# Altium PCB DA13_FPGA_edition.PcbDoc (part 2 of 3)
Units mm, origin at the board's own origin, x right, y up, seen from the top; angles counter-clockwise.
Board outline 118.01 x 92.01 mm, 2 copper layers (Top Layer, Bottom Layer); 473 components, 250 nets, 1417 pads, 16 vias.
Unrouted connection lines stored in the file: 993.
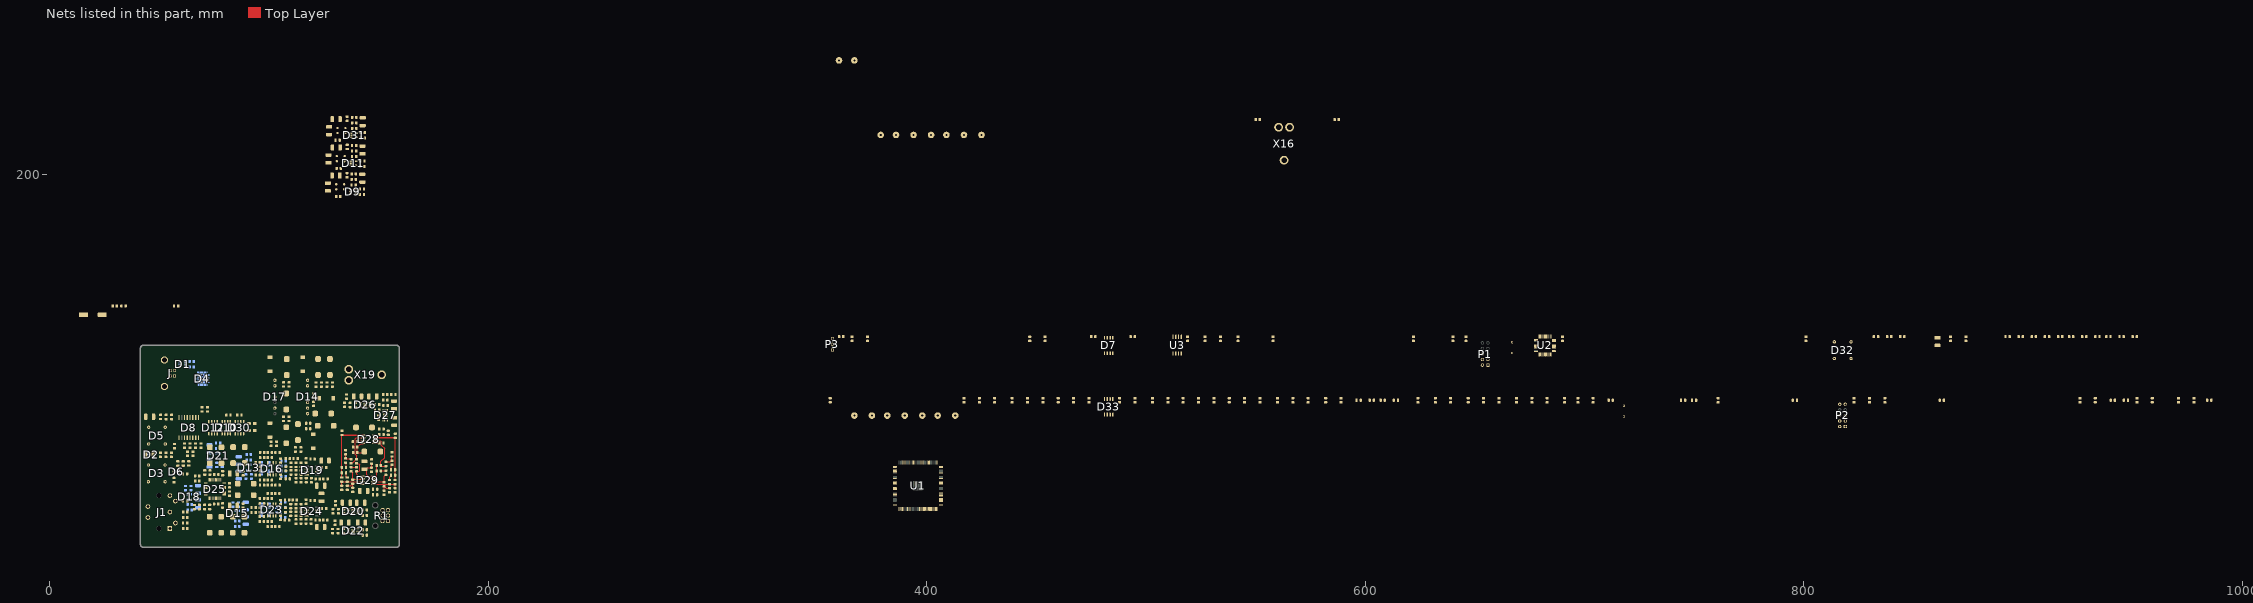
[diagram p2: the nets of this part, all layers, seen from the top]

## Part data
C1 C3 C7 C8 C11 C15 C16 C17 C18 C19 C20 C21 C22 C23 C24 C25 C26 C27 C28 C29 C32 C35 C37 C39 C42 C44 C46 C47 C48 C49 C50 C54 C55 C56 C58 C59 C60 C63 C64 C66 C67 C68 C70 C71 C72 C74 C75 C76 C77 C78 C79 C80 C81 C85 C87 C88 C89 C90 C91 C92 C93 C94 C95 C98 C99 C101 C102 C106 C107 C108 C109 C110 C113 C114 C115 C120 C121 C122 C123 C124 C125 C126 C127 C128 C129 C130 C131 C132 C133 C134 C137 C139 C143 C144 C146 C149 C154 C155 C156 C159 C160 C161 C162 C165 C166 C167 C168 C169 C170 C171 C174 C175 C176 C179 C180 C181 C182 C183 C185 C186 C187 C188 C191 C193 C195 C198 C199 C202 C203 C204 C205 C206 C207 C208 C209 C210 C211 C212 C213 C214 C215 C216 C217 C218 C219 C220 C221 C222 C223 C224 C225 C226 C227 C228 C229 C230 C231 C232 C233 C234 C235 C236 C237: "Ceramic capacitor 0805 X7R 0.1µF 50V", Capacitance=100nF, Case Code (Imperial)=0805, Case Code (Metric)=2012, Dielectric=X7R, Manufacturer 1=Yageo, Max Operating Temperature=125°C, Min Operating Temperature=-55°C, Supplier Part Number 1=311-4351-1-ND, Tolerance=20%, Voltage=50V, Case/Package=0805, Category="Ceramic Capacitors", ComponentLink1Description=https://datasheet.ciiva.com/13207/upy-gphc-x7r-6-3v-to-50v-8-12304-13207535.pdf?src-supplier=Mouser, ComponentLink1URL=https://datasheet.ciiva.com/13207/upy-gphc-x7r-6-3v-to-50v-8-12304-13207535.pdf?src-supplier=Mouser, Depth=1.25mm, Halogen Free="Halogen Free", Lead Free="Lead Free", Length=0.079inch, Manufacturer Part Number 1=CC0805MRX7R9BB104, Mount=SMT, Packaging="Tape and Reel", Pricing 1="1=0,15000, 10=0,10700, 50=0,06080, 100=0,05040, 500=0,03536, 1000=0,02927 (USD)", RoHS=Yes, RoHS Compliant=Yes, Series=CC, Stock 1=29978, Supplier 1=Digi-Key, Thickness=0.037inch, Type=Конденсатор, Voltage Rating=50V, Voltage Rating (DC)=50V, Width=0.049inch
C2 C5 C9 C31 C34 C36 C38 C41 C43 C52 C53 C61 C62 C82 C83 C96 C97 C100 C103 C104 C105 C111 C112 C116 C117 C118 C119 C136 C140 C157 C158 C163 C164 C177 C178 C184 C189 C190 C194 C196: library part TANT_B, "Описание свойств компонента"
C4: "Aluminium capacitor 10x10.2 1000 µF 10 V", Capacitance=1mF, Case Code (Metric)=10x10.2, Case/Package="10x10,2 (SMD-2)", Dielectric Material=Aluminium, ESR (Equivalent Series Resistance)=80mR, Leakage Current=100uA, Manufacturer 2=Panasonic, Manufacturer Part Number 2=EEE-FK1A102AP, Max Operating Temperature=105°C, Min Operating Temperature=-55°C, Package Quantity=500, Ripple Current=850mA, Supplier Part Number 1=EEE-FK1E471GP, Tolerance=20%, Voltage=10V, Category="Aluminum Electrolytic Capacitors", ComponentLink1Description=https://datasheet.ciiva.com/11783/0900766b80bed286-11783449.pdf?src-supplier=RSComponents, ComponentLink1URL=https://datasheet.ciiva.com/11783/0900766b80bed286-11783449.pdf?src-supplier=RSComponents, ComponentLink2Description=https://datasheet.ciiva.com/43454/58258-43454698.pdf?src-supplier=Farnell, ComponentLink2URL=https://datasheet.ciiva.com/43454/58258-43454698.pdf?src-supplier=Farnell, ComponentLink3Description=https://datasheet.ciiva.com/46388/58258-46388200.pdf?src-supplier=Element14, ComponentLink3URL=https://datasheet.ciiva.com/46388/58258-46388200.pdf?src-supplier=Element14, ComponentLink4Description=https://datasheet.ciiva.com/24024/aba0000ce120-24024165.pdf?src-supplier=Mouser, ComponentLink4URL=https://datasheet.ciiva.com/24024/aba0000ce120-24024165.pdf?src-supplier=Mouser, ComponentLink5Description=https://datasheet.ciiva.com/14602/70068081-14602683.pdf?src-supplier=Allied+Electronics, ComponentLink5URL=https://datasheet.ciiva.com/14602/70068081-14602683.pdf?src-supplier=Allied+Electronics, ComponentLink6Description=https://datasheet.ciiva.com/14607/70068081-14607445.pdf?src-supplier=Allied+Electronics, ComponentLink6URL=https://datasheet.ciiva.com/14607/70068081-14607445.pdf?src-supplier=Allied+Electronics, ComponentLink7Description=https://datasheet.ciiva.com/2985/aba0000ce119-2985368.pdf?src-supplier=Avnet, ComponentLink7URL=https://datasheet.ciiva.com/2985/aba0000ce119-2985368.pdf?src-supplier=Avnet, ComponentLink8Description=https://datasheet.ciiva.com/2985/aba0000ce119-2985367.pdf?src-supplier=Avnet, ComponentLink8URL=https://datasheet.ciiva.com/2985/aba0000ce119-2985367.pdf?src-supplier=Avnet, Construction=Cylindrical, Contact Plating=Tin, Diameter=10mm, Dissipation Factor=0.19%, Height=10.2mm, Height - Seated (Max)=0.402inch, Impedance=80mR, Lead Free="Lead Free", Lead Length=3.5mm, Lead Pitch=4.6mm, Length=10.2mm, Life (Hours)=2000Hour, Mount=SMT, Number of Pins=2, Packaging="Tape and Reel", Pricing 2="1=0,75620, 500=0,34460 (USD)", Radiation Hardening=No, REACH SVHC=Unknown, Ripple Current (AC)=850mA, RoHS=Yes, RoHS Compliant=Yes, Series=FK, Stock 2=4, Supplier 1=Avnet, Supplier 2="Arrow Electronics", Termination=SMD/SMT, Type="Конденсатор электролитический", Voltage Rating=10V, Voltage Rating (DC)=10V, Width=10.3mm
C6 C10 C14 C197: "Ceramic capacitor 0805 C0G 16pF 50V", Capacitance=22pF, Case Code (Imperial)=0805, Case Code (Metric)=2012, Dielectric=C0G, Dielectric Material=Ceramic, Manufacturer 1=Yageo, Manufacturer Part Number 1=CC0805JRNPO9BN220, Max Operating Temperature=125°C, Min Operating Temperature=-55°C, Package Quantity=1, Supplier Part Number 1=311-1103-1-ND, Tolerance=5%, Voltage=50V, Case/Package=0805, Category="Ceramic Capacitors", ComponentLink1Description=https://datasheet.ciiva.com/144/mlccorderingcode-144745.pdf?src-supplier=Digi-Key, ComponentLink1URL=https://datasheet.ciiva.com/144/mlccorderingcode-144745.pdf?src-supplier=Digi-Key, ComponentLink2Description=https://datasheet.ciiva.com/8033/1734582-8033931.pdf?src-supplier=Element14, ComponentLink2URL=https://datasheet.ciiva.com/8033/1734582-8033931.pdf?src-supplier=Element14, ComponentLink3Description=https://datasheet.ciiva.com/8033/1734582-8033933.pdf?src-supplier=Element14, ComponentLink3URL=https://datasheet.ciiva.com/8033/1734582-8033933.pdf?src-supplier=Element14, ComponentLink4Description=https://datasheet.ciiva.com/144/mlccorderingcode-144746.pdf?src-supplier=Digi-Key, ComponentLink4URL=https://datasheet.ciiva.com/144/mlccorderingcode-144746.pdf?src-supplier=Digi-Key, ComponentLink5Description=https://datasheet.ciiva.com/144/mlccorderingcode-144747.pdf?src-supplier=Digi-Key, ComponentLink5URL=https://datasheet.ciiva.com/144/mlccorderingcode-144747.pdf?src-supplier=Digi-Key, ComponentLink6Description=https://datasheet.ciiva.com/13264/upy-gp-np0-16v-to-50v-8-3714-13264491.pdf?src-supplier=Mouser, ComponentLink6URL=https://datasheet.ciiva.com/13264/upy-gp-np0-16v-to-50v-8-3714-13264491.pdf?src-supplier=Mouser, Construction=Flat, Depth=1.25mm, Height=0.6mm, Lead Free="Lead Free", Length=2mm, Manufacturer 2=Yageo, Manufacturer Part Number 2=CC0805JRNPO9BN160, Mount=SMT, Number of Pins=2, Packaging="Tape and Reel", Pricing 1="1=0,11000, 10=0,07800, 50=0,04280, 100=0,03490, 500=0,02492, 1000=0,01958 (USD)", Pricing 2="1=0,15000, 10=0,10700, 50=0,06080, 100=0,05040, 500=0,03536, 1000=0,02927 (USD)", Radiation Hardening=No, REACH SVHC="No SVHC", Resistor Type=Ceramic, RoHS=Yes, RoHS Compliant=Yes, Series=CC, Stock 1=117464, Stock 2=956, Supplier 1=Digi-Key, Supplier 2=Digi-Key, Supplier Part Number 2=311-4228-1-ND, Termination=SMD/SMT, Thickness=0.024inch, Type=Конденсатор, Voltage Rating=50V, Voltage Rating (DC)=50V, Weight=0.000194oz, Width=1.25mm
C12 C13 C200 C201: "Ceramic capacitor 0805 NPO 22pF 16V", Capacitance=22pF, Case Code (Imperial)=0805, Case Code (Metric)=2012, Dielectric=C0G, Dielectric Material=Ceramic, Manufacturer 1=Yageo, Manufacturer Part Number 1=CC0805JRNPO9BN220, Max Operating Temperature=125°C, Min Operating Temperature=-55°C, Package Quantity=1, Supplier Part Number 1=311-1103-1-ND, Tolerance=5%, Voltage=50V, Case/Package=0805, Category="Ceramic Capacitors", ComponentLink1Description=https://datasheet.ciiva.com/144/mlccorderingcode-144745.pdf?src-supplier=Digi-Key, ComponentLink1URL=https://datasheet.ciiva.com/144/mlccorderingcode-144745.pdf?src-supplier=Digi-Key, ComponentLink2Description=https://datasheet.ciiva.com/8033/1734582-8033931.pdf?src-supplier=Element14, ComponentLink2URL=https://datasheet.ciiva.com/8033/1734582-8033931.pdf?src-supplier=Element14, ComponentLink3Description=https://datasheet.ciiva.com/8033/1734582-8033933.pdf?src-supplier=Element14, ComponentLink3URL=https://datasheet.ciiva.com/8033/1734582-8033933.pdf?src-supplier=Element14, ComponentLink4Description=https://datasheet.ciiva.com/144/mlccorderingcode-144746.pdf?src-supplier=Digi-Key, ComponentLink4URL=https://datasheet.ciiva.com/144/mlccorderingcode-144746.pdf?src-supplier=Digi-Key, ComponentLink5Description=https://datasheet.ciiva.com/144/mlccorderingcode-144747.pdf?src-supplier=Digi-Key, ComponentLink5URL=https://datasheet.ciiva.com/144/mlccorderingcode-144747.pdf?src-supplier=Digi-Key, Construction=Flat, Depth=1.25mm, Height=0.6mm, Lead Free="Lead Free", Length=2mm, Mount=SMT, Number of Pins=2, Packaging="Tape and Reel", Pricing 1="1=0,11000, 10=0,07800, 50=0,04280, 100=0,03490, 500=0,02492, 1000=0,01958 (USD)", Radiation Hardening=No, REACH SVHC="No SVHC", Resistor Type=Ceramic, RoHS=Yes, RoHS Compliant=Yes, Series=CC, Stock 1=117464, Supplier 1=Digi-Key, Termination=SMD/SMT, Thickness=0.024inch, Type=Конденсатор, Voltage Rating=50V, Voltage Rating (DC)=50V, Width=1.25mm
C30: "Ceramic capacitor 1206 X7R 22µF 10V", Capacitance=22uF, Case Code (Imperial)=1206, Case Code (Metric)=3216, Dielectric=X7R, Manufacturer 1=Murata, Max Operating Temperature=125°C, Min Operating Temperature=-55°C, Package Quantity=1, Tolerance=10%, Voltage=10V, Case/Package=1206, Category="Ceramic Capacitors", ComponentLink1Description=https://datasheet.ciiva.com/6072/1747483-6072695.pdf?src-supplier=Farnell, ComponentLink1URL=https://datasheet.ciiva.com/6072/1747483-6072695.pdf?src-supplier=Farnell, ComponentLink2Description=https://datasheet.ciiva.com/11787/0900766b80ef921d-11787760.pdf?src-supplier=RSComponents, ComponentLink2URL=https://datasheet.ciiva.com/11787/0900766b80ef921d-11787760.pdf?src-supplier=RSComponents, ComponentLink3Description=https://datasheet.ciiva.com/3777/1492grm31cr71a226ke1523-3777120.pdf?src-supplier=Arrow+Electronics, ComponentLink3URL=https://datasheet.ciiva.com/3777/1492grm31cr71a226ke1523-3777120.pdf?src-supplier=Arrow+Electronics, ComponentLink4Description=https://datasheet.ciiva.com/29202/451120-da-01-de-vs-chip-kond-1206-22-0-uf-10pr-10-0v-x7r-29202604.pdf?src-supplier=Conrad, ComponentLink4URL=https://datasheet.ciiva.com/29202/451120-da-01-de-vs-chip-kond-1206-22-0-uf-10pr-10-0v-x7r-29202604.pdf?src-supplier=Conrad, ComponentLink5Description=https://datasheet.ciiva.com/29202/451412-da-01-de-vs-kondens-grm31-cr71a-226ke15l-29202268.pdf?src-supplier=Conrad, ComponentLink5URL=https://datasheet.ciiva.com/29202/451412-da-01-de-vs-kondens-grm31-cr71a-226ke15l-29202268.pdf?src-supplier=Conrad, ComponentLink6Description=https://datasheet.ciiva.com/14116/grmseries-highdielectrictype-eng-14116398.pdf?src-supplier=Distrelec, ComponentLink6URL=https://datasheet.ciiva.com/14116/grmseries-highdielectrictype-eng-14116398.pdf?src-supplier=Distrelec, ComponentLink7Description=https://datasheet.ciiva.com/7937/1747483-7937735.pdf?src-supplier=Element14, ComponentLink7URL=https://datasheet.ciiva.com/7937/1747483-7937735.pdf?src-supplier=Element14, ComponentLink8Description=https://datasheet.ciiva.com/142/partnumbering-e-01-142120.pdf?src-supplier=Digi-Key, ComponentLink8URL=https://datasheet.ciiva.com/142/partnumbering-e-01-142120.pdf?src-supplier=Digi-Key, ComponentLink9Description=https://datasheet.ciiva.com/142/partnumbering-e-01-142119.pdf?src-supplier=Digi-Key, ComponentLink9URL=https://datasheet.ciiva.com/142/partnumbering-e-01-142119.pdf?src-supplier=Digi-Key, ComponentLink10Description=https://datasheet.ciiva.com/142/partnumbering-e-01-142121.pdf?src-supplier=Digi-Key, ComponentLink10URL=https://datasheet.ciiva.com/142/partnumbering-e-01-142121.pdf?src-supplier=Digi-Key, ComponentLink11Description=https://datasheet.ciiva.com/48671/product-48671339.pdf?src-supplier=Avnet, ComponentLink11URL=https://datasheet.ciiva.com/48671/product-48671339.pdf?src-supplier=Avnet, ComponentLink12Description=https://datasheet.ciiva.com/16440/product-16440671.pdf?src-supplier=Future+Electronics, ComponentLink12URL=https://datasheet.ciiva.com/16440/product-16440671.pdf?src-supplier=Future+Electronics, ComponentLink13Description=https://datasheet.ciiva.com/2989/product-2989773.pdf?src-supplier=Avnet, ComponentLink13URL=https://datasheet.ciiva.com/2989/product-2989773.pdf?src-supplier=Avnet, Construction=Flat, Depth=1.6mm, Height=1.6mm, Lead Free="Lead Free", Length=3.2mm, Manufacturer Part Number 1=GRM31CR71A226KE15L, Material=Ceramic, Mount=SMT, Packaging="Tape and Reel", Pricing 1="1=0,81930, 10=0,51230, 25=0,48340, 100=0,42480, 250=0,42420, 500=0,35180, 1000=0,34810, 3000=0,30810, 6000=0,24770, 15000=0,23430 (USD)", Radiation Hardening=No, REACH SVHC="No SVHC", RoHS=Yes, RoHS Compliant=Yes, Series=GRM, Stock 1=16303, Supplier 1="Arrow Electronics", Supplier Part Number 1=GRM31CR71A226KE15L, Termination=SMD/SMT, Thickness=0.071inch, Type=Конденсатор, Voltage Rating=10V, Voltage Rating (DC)=10V, Width=0.063inch
C33 C40 C192: "Ceramic capacitor 0805 X7R 100pF 50V", Capacitance=1nF, Case Code (Imperial)=0805, Case Code (Metric)=2012, Dielectric=X7R, Manufacturer 2=Yageo, Manufacturer Part Number 2=CC0805MRX7R9BB102, Max Operating Temperature=125°C, Min Operating Temperature=-55°C, Resistor Type=Ceramic, Supplier Part Number 1=311-4349-1-ND, Tolerance=20%, Voltage=50V, Case/Package=0805, Category="Ceramic Capacitors", ComponentLink1Description=http://www.mouser.com/ds/2/447/Yageo_UPY-GP_NP0_16V-to-50V_9-358835.pdf?src-supplier=Mouser, ComponentLink1URL=http://www.mouser.com/ds/2/447/Yageo_UPY-GP_NP0_16V-to-50V_9-358835.pdf?src-supplier=Mouser, ComponentLink2Description=http://components.arrow.com/part/dataview/0323_04166629?src-supplier=Arrow+Europe, ComponentLink2URL=http://components.arrow.com/part/dataview/0323_04166629?src-supplier=Arrow+Europe, ComponentLink3Description=http://www.yageo.com/documents/recent/UPY-GPHC_X7R_6.3V-to-50V_18.pdf?src-supplier=Digi-Key, ComponentLink3URL=http://www.yageo.com/documents/recent/UPY-GPHC_X7R_6.3V-to-50V_18.pdf?src-supplier=Digi-Key, Depth=1.25mm, Halogen Free="Halogen Free", Lead Free="Lead Free", Length=0.079inch, Mount=SMT, Packaging="Tape and Reel", Pricing 2="1=0,14000, 10=0,08800, 50=0,08800, 100=0,03900, 1000=0,02500, 10000=0,02100 (USD)", RoHS=Yes, RoHS Compliant=Yes, Series=CC, Stock 2=5617, Supplier 1=Digi-Key, Supplier 2=Mouser, Supplier Part Number 2=603-CC805MRX7R9BB102, Thickness=0.028inch, Type=Конденсатор, Voltage Rating=50V, Voltage Rating (DC)=50V, Width=0.049inch
C45 C51 C57 C65 C69 C73 C84 C86 C135 C138 C141 C142 C147 C148 C150 C151 C152 C153 C172 C173: library part TANT_D, "Описание свойств компонента"
C145: "Ceramic capacitor 0805 X7R 1uF 50V", Capacitance=1uF, Case Code (Imperial)=0805, Case Code (Metric)=2012, Dielectric=X7R, Manufacturer 2=Yageo, Max Operating Temperature=125°C, Min Operating Temperature=-55°C, Resistor Type=Ceramic, Supplier Part Number 1=311-4349-1-ND, Tolerance=10%, Voltage=50V, Case/Package=0805, Category="Ceramic Capacitors", ComponentLink1Description=https://datasheet.ciiva.com/13209/upy-gphc-x7r-6-3v-to-50v-8-12304-13209375.pdf?src-supplier=Mouser, ComponentLink1URL=https://datasheet.ciiva.com/13209/upy-gphc-x7r-6-3v-to-50v-8-12304-13209375.pdf?src-supplier=Mouser, Construction=Flat, Depth=1.25mm, Halogen Free="Halogen Free", Height=1.25mm, Lead Free="Lead Free", Length=2mm, Manufacturer Part Number 2=CC0805KKX7R9BB105, Mount=SMT, Packaging="Tape and Reel", Pricing 2="1=0,26000, 10=0,17900, 50=0,11920, 100=0,10130, 500=0,07152, 1000=0,06257 (USD)", Radiation Hardening=No, RoHS=Yes, RoHS Compliant=Yes, Series=CC, Stock 2=48794, Supplier 1=Digi-Key, Supplier 2=Digi-Key, Supplier Part Number 2=311-1886-1-ND, Termination=SMD/SMT, Thickness=0.057inch, Type=Конденсатор, Voltage Rating=50V, Voltage Rating (DC)=50V, Weight=0.000194oz, Width=0.049inch
D1: "Very low capacitance ESD protection", Case/Package=SOT-23-6, Supplier Part Number 1=7131158, Mount=SMT, Supplier 1="Future Electronics", Type=Микросхема
D2: "Single Schmitt-Trigger Inverter", Case/Package=SOT-23-5, Supplier Part Number 1=296-11607-1-ND, Mount=SMT, Supplier 1=Digi-Key, Type=Микросхема
D3 D5 D32: library part OSC_4PIN_DIL, "Описание свойств компонента"
D4: library part CT7601, "Описание свойств компонента"
D6: library part 1G32, "Описание свойств компонента"
D7 D33: "3V 32M-BIT SERIAL FLASH MEMORY WITH DUAL, QUAD SPI", Case/Package=SOIC-8-208, Supplier Part Number 1=W25Q32JVSSIQCT-ND, Mount=SMT, Supplier 1=Digi-Key, Supplier 2=Digi-Key, Supplier 3=RSComponents, Supplier 4="Arrow Electronics", Supplier 5=RSComponents, Supplier Part Number 2=W25Q32JVSSIQ-ND, Supplier Part Number 3=1882528, Supplier Part Number 4="W25Q32JVSSIM TR", Supplier Part Number 5=1712228, Type=Микросхема
D8: library part ADUM140X, "Описание свойств компонента"
D9 D11 D31: library part SY8088, "Описание свойств компонента"
D10 D12 D30: library part ADUM1250, "Описание свойств компонента"
D13 D15 D18 D21: library part LP2985, "Описание свойств компонента"
D14: library part AM3D-0509DH30Z, "Описание свойств компонента"
D16 D23: library part OPA1632_SOIC, "Описание свойств компонента"
D17: library part AM3D-0509SZ, "Описание свойств компонента"
D19 D24: library part TL061, "Описание свойств компонента"
D20 D22 D26 D27: library part TPS7A4901/3001, "Описание свойств компонента"
D25: library part AK4490_TQFP, "Описание свойств компонента"
D28 D29: "Dual standard, industrial-grade, operational amplifier 8-SOIC -25 to 85", Case/Package=SOIC-8-150, Dual Supply Voltage=9V, Input Bias Current=200pA, Input Offset Voltage (Vos)=3mV, Manufacturer 1="Texas Instruments", Manufacturer Part Number 2=TL062ID, Max Dual Supply Voltage=18V, Max I/O Voltage=6mV, Max Operating Temperature=85°C, Max Supply Current=500uA, Min Dual Supply Voltage=3.5V, Min Operating Temperature=-40°C, Min Supply Voltage=3V, Operating Supply Current=200uA, Output Current=30mA, Package Quantity=50, Supplier Part Number 1=595-LM258DR, Supply Current=1.2mA, Voltage Gain=75.56dB, Amplifier Type="GENERAL PURPOSE", Bandwidth=1MHz, Category="Amplifiers - Op Amps, Buffer, Instrumentation", Common Mode Rejection Ratio=80dB, ComponentLink1Description=https://datasheet.ciiva.com/27051/1063193-27051334.pdf?src-supplier=Jameco, ComponentLink1URL=https://datasheet.ciiva.com/27051/1063193-27051334.pdf?src-supplier=Jameco, ComponentLink2Description=https://datasheet.ciiva.com/7738/1768032-7738657.pdf?src-supplier=Element14, ComponentLink2URL=https://datasheet.ciiva.com/7738/1768032-7738657.pdf?src-supplier=Element14, ComponentLink3Description=https://datasheet.ciiva.com/14151/tl06x-series-eng-tds-14151159.pdf?src-supplier=Distrelec, ComponentLink3URL=https://datasheet.ciiva.com/14151/tl06x-series-eng-tds-14151159.pdf?src-supplier=Distrelec, ComponentLink4Description=https://datasheet.ciiva.com/1797/tl062a-1797198.pdf?src-supplier=Digi-Key, ComponentLink4URL=https://datasheet.ciiva.com/1797/tl062a-1797198.pdf?src-supplier=Digi-Key, ComponentLink5Description=https://datasheet.ciiva.com/15129/getdatasheetpartid-40375-15129693.pdf?src-supplier=Verical, ComponentLink5URL=https://datasheet.ciiva.com/15129/getdatasheetpartid-40375-15129693.pdf?src-supplier=Verical, ComponentLink6Description=https://datasheet.ciiva.com/1797/tl062a-1797276.pdf?src-supplier=Digi-Key, ComponentLink6URL=https://datasheet.ciiva.com/1797/tl062a-1797276.pdf?src-supplier=Digi-Key, ComponentLink7Description=https://datasheet.ciiva.com/7738/1634178-7738543.pdf?src-supplier=Element14, ComponentLink7URL=https://datasheet.ciiva.com/7738/1634178-7738543.pdf?src-supplier=Element14, ComponentLink8Description=https://datasheet.ciiva.com/2974/tl062-2974181.pdf?src-supplier=Avnet, ComponentLink8URL=https://datasheet.ciiva.com/2974/tl062-2974181.pdf?src-supplier=Avnet, ComponentLink9Description=https://datasheet.ciiva.com/48712/001011491-da-01-en-ic-opamp-jfet-1mhz-du-tl062id-soic-8-tid-48712330.pdf?src-supplier=Conrad, ComponentLink9URL=https://datasheet.ciiva.com/48712/001011491-da-01-en-ic-opamp-jfet-1mhz-du-tl062id-soic-8-tid-48712330.pdf?src-supplier=Conrad, ComponentLink10Description=https://datasheet.ciiva.com/34302/1342934-34302235.pdf?src-supplier=Jameco, ComponentLink10URL=https://datasheet.ciiva.com/34302/1342934-34302235.pdf?src-supplier=Jameco, ComponentLink11Description=https://datasheet.ciiva.com/1795/lm258a-1795505.pdf?src-supplier=Digi-Key, ComponentLink11URL=https://datasheet.ciiva.com/1795/lm258a-1795505.pdf?src-supplier=Digi-Key, ComponentLink12Description=https://datasheet.ciiva.com/1795/lm258a-1795506.pdf?src-supplier=Digi-Key, ComponentLink12URL=https://datasheet.ciiva.com/1795/lm258a-1795506.pdf?src-supplier=Digi-Key, ComponentLink13Description=https://datasheet.ciiva.com/1795/lm258a-1795507.pdf?src-supplier=Digi-Key, ComponentLink13URL=https://datasheet.ciiva.com/1795/lm258a-1795507.pdf?src-supplier=Digi-Key, ComponentLink14Description=https://datasheet.ciiva.com/2973/lm358a-2973285.pdf?src-supplier=Avnet, ComponentLink14URL=https://datasheet.ciiva.com/2973/lm358a-2973285.pdf?src-supplier=Avnet, ComponentLink15Description=https://datasheet.ciiva.com/26223/lm358a-26223035.pdf?src-supplier=Avnet+Europe, ComponentLink15URL=https://datasheet.ciiva.com/26223/lm358a-26223035.pdf?src-supplier=Avnet+Europe, ComponentLink16Description=https://datasheet.ciiva.com/16464/lm358a-16464604.pdf?src-supplier=Avnet+Asia, ComponentLink16URL=https://datasheet.ciiva.com/16464/lm358a-16464604.pdf?src-supplier=Avnet+Asia, ComponentLink17Description=https://datasheet.ciiva.com/48711/001071481-da-01-en-ic-opamp-gp-700khz-du-lm258dr-soic-8-tid-48711227.pdf?src-supplier=Conrad, ComponentLink17URL=https://datasheet.ciiva.com/48711/001071481-da-01-en-ic-opamp-gp-700khz-du-lm258dr-soic-8-tid-48711227.pdf?src-supplier=Conrad, Contact Plating=Gold, Gain Bandwidth Product=1MHz, Height=4.57mm, Lead Free="Lead Free", Length=9.81mm, Manufacturer 2="Texas Instruments", Manufacturer Part Number 1=LM258DR, Max Supply Voltage=18V, Mount=SMT, Nominal Gain Bandwidth Product=1MHz, Nominal Supply Current=500uA, Number of Amplifiers=2, Number of Channels=2, Number of Circuits=2, Number of Elements=2, Number of Pins=8, Operating Supply Voltage=18V, Output Current per Channel=30mA, Packaging=Rail/Tube, Pricing 1="2500=0,11900 (USD)", Pricing 2="1=1,40000, 10=1,25400, 25=1,19000, 100=0,97760, 250=0,91388, 500=0,80762, 1000=0,70175 (USD)", Radiation Hardening=No, REACH SVHC="No SVHC", RoHS=Yes, RoHS Compliant=Yes, Series=-, Slew Rate=3.5V/µs, Stock 1=59536, Stock 2=9100, Supplier 1=Mouser, Technology=BIPOLAR, Type=Микросхема, Unity Gain Bandwidth Product=1MHz, Width=6.35mm
J: "USB-B Series USB 2.0 Interface, Type B", Package=None, Availability=Unavailable, MF=Samtec, MP=USB-B-S-S-B-TH-TR, Price=None, SnapEDA_Link=https://www.snapeda.com/parts/USB-B-S-S-B-TH-TR/Samtec/view-part/230657/?ref=snap
J1: "DIN Receptacle Receptacle 5 Female PCB Mount", Package=None, Check_prices=https://www.snapeda.com/parts/57PC5F/SWITCHCRAFT/view-part/?ref=eda, MF="Switchcraft Inc.", MP=57PC5F, SnapEDA_Link=https://www.snapeda.com/parts/57PC5F/SWITCHCRAFT/view-part/?ref=snap
L1 L2 L3 L4 L5 L6 L9 L12 L15 L18 L20 L21 L24 L25: library part SMD_BLM0805, "Описание свойств компонента"
L7 L8 L10 L11 L22 L23: library part LQH32MN220J23L, "Chip Coils for DC-DC Converter Wire Wound Type LQH32MN_23 Series 1210 (3225) 220 uH, 150 mA", Case/Package=SMD-2, Supplier Part Number 1=490-4048-1-ND, Mount=SMT, Supplier 1=Digi-Key, Type="Катушка индуктивности"
L13 L14 L16 L17 L19: "Shielded Inductors 470 uH, 260 mA, 3.01 Ohm", Case/Package=SMD-2, Supplier Part Number 1=CDRH74NP-471MC-B, Mount=SMT, Supplier 1=Avnet, Type="Катушка индуктивности"
P1 P2: library part "Header 5X2", "Header, 5-Pin, Dual row", LatestRevisionDate=17-Jul-2002, LatestRevisionNote="Re-released for DXP Platform.", Publisher="Altium Limited"
P3: library part "Header 3", "Header, 3-Pin", LatestRevisionDate=17-Jul-2002, LatestRevisionNote="Re-released for DXP Platform.", Publisher="Altium Limited"
R1: library part ALPS_RK09L, "Описание свойств компонента"
R2 R3 R4 R5 R28 R30 R31 R32: "Chip Resistor Surface Mount 0805 10 кОм", Case Code (Imperial)=0805, Case Code (Metric)=2012, Manufacturer 1=Yageo, Max Operating Temperature=155°C, Max Power Dissipation=125mW, Min Operating Temperature=-55°C, Resistance=10kR, Resistance Tolerance=5%, Resistor Type="Thick Film", Supplier Part Number 1=1995759, Temperature Coefficient=100ppm/°C, Voltage Rating=150V, Case/Package=0805, Category="Chip SMD Resistors", ComponentLink1Description=https://datasheet.ciiva.com/7983/444164-7983765.pdf?src-supplier=Element14, ComponentLink1URL=https://datasheet.ciiva.com/7983/444164-7983765.pdf?src-supplier=Element14, ComponentLink2Description=https://datasheet.ciiva.com/7941/444164-7941870.pdf?src-supplier=Element14, ComponentLink2URL=https://datasheet.ciiva.com/7941/444164-7941870.pdf?src-supplier=Element14, ComponentLink3Description=https://datasheet.ciiva.com/7941/444164-7941871.pdf?src-supplier=Element14, ComponentLink3URL=https://datasheet.ciiva.com/7941/444164-7941871.pdf?src-supplier=Element14, Construction=Rectangular, Contact Plating=Tin,Matte, Depth=1.25mm, Features="Moisture Resistant", Height=0.5mm, Lead Free="Lead Free", Length=2mm, Manufacturer Part Number 1=RC0805JR-0710KL, Military Standard=Not, Mount=SMT, Number of Terminations=2, Packaging="Tape and Reel", Power Rating=125mW, Pricing 1="5000=0,00300 (GBP)", Radiation Hardening=No, REACH SVHC=Unknown, RoHS=Yes, RoHS Compliant=Yes, Series=RC, Size Code=0805, Stock 1=30000, Supplier 1=RSComponents, Termination=SMD/SMT, Tolerance=5%, Type=Резистор, Width=1.25mm
R6 R21 R77 R83 R97: "Chip Resistor Surface Mount 0805 47 Ом", Case Code (Imperial)=0805, Case Code (Metric)=2012, Manufacturer 1=Yageo, Manufacturer Part Number 1=RC0805JR-0718RL, Max Operating Temperature=155°C, Max Power Dissipation=125mW, Min Operating Temperature=-55°C, Package Quantity=1, Resistance=47R, Resistance Tolerance=5%, Resistor Type="Thick Film", Supplier Part Number 1=1799501, Temperature Coefficient=100ppm/°C, Voltage Rating=150V, Case/Package=0805, Category="Chip SMD Resistors", ComponentLink1Description=https://datasheet.ciiva.com/2508/pyu-r-int-thick-7-2508730.pdf?src-supplier=Digi-Key, ComponentLink1URL=https://datasheet.ciiva.com/2508/pyu-r-int-thick-7-2508730.pdf?src-supplier=Digi-Key, ComponentLink2Description=https://datasheet.ciiva.com/2508/pyu-r-int-thick-7-2508731.pdf?src-supplier=Digi-Key, ComponentLink2URL=https://datasheet.ciiva.com/2508/pyu-r-int-thick-7-2508731.pdf?src-supplier=Digi-Key, ComponentLink3Description=https://datasheet.ciiva.com/2508/pyu-r-int-thick-7-2508729.pdf?src-supplier=Digi-Key, ComponentLink3URL=https://datasheet.ciiva.com/2508/pyu-r-int-thick-7-2508729.pdf?src-supplier=Digi-Key, ComponentLink4Description=https://datasheet.ciiva.com/12558/rc0805-257173-12558905.pdf?src-supplier=Mouser, ComponentLink4URL=https://datasheet.ciiva.com/12558/rc0805-257173-12558905.pdf?src-supplier=Mouser, ComponentLink5Description=https://datasheet.ciiva.com/7941/442941-7941903.pdf?src-supplier=Element14, ComponentLink5URL=https://datasheet.ciiva.com/7941/442941-7941903.pdf?src-supplier=Element14, ComponentLink6Description=https://datasheet.ciiva.com/17043/rc0805-17043703.pdf?src-supplier=Future+Electronics, ComponentLink6URL=https://datasheet.ciiva.com/17043/rc0805-17043703.pdf?src-supplier=Future+Electronics, Construction=Rectangular, Contact Plating=Tin,Matte,Lead, Depth=1.25mm, Features="Moisture Resistant", Height=0.024inch, Lead Free="Lead Free", Length=2mm, Military Standard=Not, Mount=SMT, Number of Terminations=2, Packaging="Tape and Reel", Power Rating=125mW, Pricing 1="1=0,03540, 10=0,01050, 25=0,01040, 100=0,00430, 250=0,00420, 1000=0,00230, 3000=0,00210, 6000=0,00180 (USD)", Radiation Hardening=No, REACH SVHC=Unknown, RoHS=Yes, RoHS Compliant=Yes, Series=RC, Size Code=0805, Stock 1=12330, Supplier 1=Farnell, Termination=SMD/SMT, Tolerance=5%, Type=Резистор, Width=0.049inch
R7 R8: "Chip Resistor Surface Mount 0805 24 Ом", Case Code (Imperial)=0805, Case Code (Metric)=2012, Manufacturer 1=Yageo, Max Operating Temperature=155°C, Max Power Dissipation=125mW, Min Operating Temperature=-55°C, Package Quantity=1, Resistance=24R, Resistor Type="Thick Film", Temperature Coefficient=100ppm/°C, Tolerance=5%, Voltage Rating=150V, Case/Package=0805, Category="Chip SMD Resistors", ComponentLink1Description=https://datasheet.ciiva.com/2456/pyu-r-int-thick-7-2456171.pdf?src-supplier=Digi-Key, ComponentLink1URL=https://datasheet.ciiva.com/2456/pyu-r-int-thick-7-2456171.pdf?src-supplier=Digi-Key, ComponentLink2Description=https://datasheet.ciiva.com/2456/pyu-r-int-thick-7-2456172.pdf?src-supplier=Digi-Key, ComponentLink2URL=https://datasheet.ciiva.com/2456/pyu-r-int-thick-7-2456172.pdf?src-supplier=Digi-Key, ComponentLink3Description=https://datasheet.ciiva.com/2456/pyu-r-int-thick-7-2456170.pdf?src-supplier=Digi-Key, ComponentLink3URL=https://datasheet.ciiva.com/2456/pyu-r-int-thick-7-2456170.pdf?src-supplier=Digi-Key, ComponentLink4Description=https://datasheet.ciiva.com/16776/rc0805-16776854.pdf?src-supplier=Future+Electronics, ComponentLink4URL=https://datasheet.ciiva.com/16776/rc0805-16776854.pdf?src-supplier=Future+Electronics, Construction=Rectangular, Contact Plating=Tin,Matte,Lead, Depth=1.25mm, Features="Moisture Resistant", Height=0.024inch, Lead Free="Lead Free", Length=2mm, Manufacturer Part Number 1=RC0805JR-0724RL, Military Standard=Not, Mount=SMT, Number of Terminations=2, Packaging="Tape and Reel", Power Rating=125mW, Pricing 1="1=0,06100, 10=0,03050, 25=0,03020, 100=0,01240, 250=0,01230 (USD)", Radiation Hardening=No, RoHS=Yes, RoHS Compliant=Yes, Series=RC, Size Code=0805, Stock 1=375, Supplier 1="Arrow Electronics", Supplier Part Number 1=RC0805JR-0724RL, Termination=SMD/SMT, Type=Резистор, Voltage Rating (DC)=150V, Width=0.049inch
R9 R12 R13 R14 R15 R16 R17 R22 R23 R24 R25 R26 R27 R33 R34 R40 R44 R48 R55 R56 R59 R60 R67 R71 R75 R82 R84 R86 R87 R88 R90 R100 R125 R126 R127 R128 R129 R130 R137 R138 R139 R140 R147: "Chip Resistor Surface Mount 0805 10 Ом", Case Code (Imperial)=0805, Case Code (Metric)=2012, Manufacturer 1=Yageo, Max Operating Temperature=155°C, Max Power Dissipation=125mW, Min Operating Temperature=-55°C, Package Quantity=1, Resistance=10R, Resistance Tolerance=5%, Resistor Type="Thick Film", Temperature Coefficient=200ppm/°C, Voltage Rating=150V, Case/Package=0805, Category="Chip SMD Resistors", ComponentLink1Description=https://datasheet.ciiva.com/46395/444164-46395129.pdf?src-supplier=Element14, ComponentLink1URL=https://datasheet.ciiva.com/46395/444164-46395129.pdf?src-supplier=Element14, ComponentLink2Description=https://datasheet.ciiva.com/2456/pyu-r-int-thick-7-2456041.pdf?src-supplier=Digi-Key, ComponentLink2URL=https://datasheet.ciiva.com/2456/pyu-r-int-thick-7-2456041.pdf?src-supplier=Digi-Key, ComponentLink3Description=https://datasheet.ciiva.com/2456/pyu-r-int-thick-7-2456042.pdf?src-supplier=Digi-Key, ComponentLink3URL=https://datasheet.ciiva.com/2456/pyu-r-int-thick-7-2456042.pdf?src-supplier=Digi-Key, ComponentLink4Description=https://datasheet.ciiva.com/2456/pyu-r-int-thick-7-2456040.pdf?src-supplier=Digi-Key, ComponentLink4URL=https://datasheet.ciiva.com/2456/pyu-r-int-thick-7-2456040.pdf?src-supplier=Digi-Key, ComponentLink5Description=https://datasheet.ciiva.com/12667/rc0805-12667031.pdf?src-supplier=Mouser, ComponentLink5URL=https://datasheet.ciiva.com/12667/rc0805-12667031.pdf?src-supplier=Mouser, Contact Plating=Tin,Matte,Lead, Features="Moisture Resistant", Height=0.024inch, Lead Free="Lead Free", Length=0.079inch, Manufacturer Part Number 1=RC0805JR-0710RL, Mount=SMT, Number of Terminations=2, Packaging="Tape and Reel", Power Rating=125mW, Pricing 1="1=0,07580, 10=0,05800, 25=0,05130 (USD)", Radiation Hardening=No, REACH SVHC=Unknown, RoHS=Yes, RoHS Compliant=Yes, Series=RC, Size Code=0805, Stock 1=27, Supplier 1="Arrow Electronics", Supplier Part Number 1=RC0805JR-0710RL, Termination=SMD/SMT, Tolerance=5%, Type=Резистор, Width=0.049inch
R10: "Chip Resistor Surface Mount 0805 18 Ом", Case Code (Imperial)=0805, Case Code (Metric)=2012, Manufacturer 1=Yageo, Max Operating Temperature=155°C, Max Power Dissipation=125mW, Min Operating Temperature=-55°C, Package Quantity=1, Resistance=18R, Resistance Tolerance=5%, Resistor Type="Thick Film", Temperature Coefficient=100ppm/°C, Voltage Rating=150V, Case/Package=0805, Category="Chip SMD Resistors", ComponentLink1Description=https://datasheet.ciiva.com/2508/pyu-r-int-thick-7-2508730.pdf?src-supplier=Digi-Key, ComponentLink1URL=https://datasheet.ciiva.com/2508/pyu-r-int-thick-7-2508730.pdf?src-supplier=Digi-Key, ComponentLink2Description=https://datasheet.ciiva.com/2508/pyu-r-int-thick-7-2508731.pdf?src-supplier=Digi-Key, ComponentLink2URL=https://datasheet.ciiva.com/2508/pyu-r-int-thick-7-2508731.pdf?src-supplier=Digi-Key, ComponentLink3Description=https://datasheet.ciiva.com/2508/pyu-r-int-thick-7-2508729.pdf?src-supplier=Digi-Key, ComponentLink3URL=https://datasheet.ciiva.com/2508/pyu-r-int-thick-7-2508729.pdf?src-supplier=Digi-Key, ComponentLink4Description=https://datasheet.ciiva.com/12558/rc0805-257173-12558905.pdf?src-supplier=Mouser, ComponentLink4URL=https://datasheet.ciiva.com/12558/rc0805-257173-12558905.pdf?src-supplier=Mouser, ComponentLink5Description=https://datasheet.ciiva.com/7941/442941-7941903.pdf?src-supplier=Element14, ComponentLink5URL=https://datasheet.ciiva.com/7941/442941-7941903.pdf?src-supplier=Element14, ComponentLink6Description=https://datasheet.ciiva.com/17043/rc0805-17043703.pdf?src-supplier=Future+Electronics, ComponentLink6URL=https://datasheet.ciiva.com/17043/rc0805-17043703.pdf?src-supplier=Future+Electronics, Construction=Rectangular, Contact Plating=Tin,Matte,Lead, Depth=1.25mm, Features="Moisture Resistant", Height=0.024inch, Lead Free="Lead Free", Length=2mm, Manufacturer Part Number 1=RC0805JR-0718RL, Military Standard=Not, Mount=SMT, Number of Terminations=2, Packaging="Tape and Reel", Power Rating=125mW, Pricing 1="1=0,03540, 10=0,01050, 25=0,01040, 100=0,00430, 250=0,00420, 1000=0,00230, 3000=0,00210, 6000=0,00180 (USD)", Radiation Hardening=No, REACH SVHC=Unknown, RoHS=Yes, RoHS Compliant=Yes, Series=RC, Size Code=0805, Stock 1=12330, Supplier 1="Arrow Electronics", Supplier Part Number 1=RC0805JR-0718RL, Termination=SMD/SMT, Tolerance=5%, Type=Резистор, Width=0.049inch
R11 R20 R54 R57 R58 R61 R98 R99 R101 R102 R103 R104 R105 R106 R107 R108 R109 R110 R111 R112 R113 R114 R115 R116 R117 R118 R119 R120 R121 R122 R123 R124 R149 R150: "Chip Resistor Surface Mount 0805 1 кОм", Case Code (Imperial)=0805, Case Code (Metric)=2012, Manufacturer 1=Yageo, Max Operating Temperature=155°C, Max Power Dissipation=125mW, Min Operating Temperature=-55°C, Resistance=1kR, Resistance Tolerance=5%, Resistor Type="Thick Film", Supplier Part Number 1=1995761, Temperature Coefficient=100ppm/°C, Voltage Rating=150V, Case/Package=0805, Category="Chip SMD Resistors", ComponentLink1Description=https://datasheet.ciiva.com/46395/444164-46395131.pdf?src-supplier=Element14, ComponentLink1URL=https://datasheet.ciiva.com/46395/444164-46395131.pdf?src-supplier=Element14, ComponentLink2Description=https://datasheet.ciiva.com/12667/rc0805-12667110.pdf?src-supplier=Mouser, ComponentLink2URL=https://datasheet.ciiva.com/12667/rc0805-12667110.pdf?src-supplier=Mouser, ComponentLink3Description=https://datasheet.ciiva.com/7941/442941-7941911.pdf?src-supplier=Element14, ComponentLink3URL=https://datasheet.ciiva.com/7941/442941-7941911.pdf?src-supplier=Element14, ComponentLink4Description=https://datasheet.ciiva.com/7941/442941-7941912.pdf?src-supplier=Element14, ComponentLink4URL=https://datasheet.ciiva.com/7941/442941-7941912.pdf?src-supplier=Element14, ComponentLink5Description=https://datasheet.ciiva.com/15190/getdatasheetpartid-135056-15190037.pdf?src-supplier=Verical, ComponentLink5URL=https://datasheet.ciiva.com/15190/getdatasheetpartid-135056-15190037.pdf?src-supplier=Verical, Construction=Rectangular, Contact Plating=Tin,Lead,Matte, Depth=1.25mm, Features="Moisture Resistant", Lead Free="Lead Free", Length=2mm, Manufacturer Part Number 1=RC0805JR-071KL, Military Standard=Not, Mount=SMT, Number of Terminations=2, Packaging="Tape and Reel", Power Rating=125mW, Pricing 1="5000=0,00300 (GBP)", Radiation Hardening=No, REACH SVHC=Unknown, RoHS=Yes, RoHS Compliant=Yes, Series=RC, Size Code=0805, Stock 1=22200, Supplier 1=RSComponents, Termination=SMD/SMT, Tolerance=5%, Type=Резистор
R18 R19 R131 R132 R133 R134 R135 R136 R141 R142 R143 R144 R145 R146: "Chip Resistor Surface Mount 0805 100 кОм", Case Code (Imperial)=0805, Case Code (Metric)=2012, Manufacturer 1=Yageo, Max Operating Temperature=155°C, Max Power Dissipation=125mW, Min Operating Temperature=-55°C, Resistance=100kR, Resistance Tolerance=5%, Resistor Type="Thick Film", Temperature Coefficient=100ppm/°C, Voltage Rating=150V, Case/Package=0805, Category="Chip SMD Resistors", ComponentLink1Description=https://datasheet.ciiva.com/7941/442941-7941865.pdf?src-supplier=Element14, ComponentLink1URL=https://datasheet.ciiva.com/7941/442941-7941865.pdf?src-supplier=Element14, ComponentLink2Description=https://datasheet.ciiva.com/7941/442941-7941864.pdf?src-supplier=Element14, ComponentLink2URL=https://datasheet.ciiva.com/7941/442941-7941864.pdf?src-supplier=Element14, ComponentLink3Description=https://datasheet.ciiva.com/15190/getdatasheetpartid-479267-15190029.pdf?src-supplier=Verical, ComponentLink3URL=https://datasheet.ciiva.com/15190/getdatasheetpartid-479267-15190029.pdf?src-supplier=Verical, Construction=Rectangular, Contact Plating=Tin,Matte,Lead, Depth=1.25mm, Features="Moisture Resistant", Lead Free="Lead Free", Length=2mm, Manufacturer Part Number 1=RC0805JR-07100KL, Military Standard=Not, Mount=SMT, Number of Terminations=2, Packaging="Tape and Reel", Power Rating=125mW, Pricing 1="1=0,05570, 10=0,03050 (USD)", Radiation Hardening=No, REACH SVHC=Unknown, RoHS=Yes, RoHS Compliant=Yes, Series=RC, Size Code=0805, Stock 1=22, Supplier 1="Arrow Electronics", Supplier Part Number 1=RC0805JR-07100KL, Termination=SMD/SMT, Tolerance=5%, Type=Резистор
R29: "Chip Resistor Surface Mount 1206 200 кОм", Case Code (Imperial)=1206, Case Code (Metric)=3216, Manufacturer 1=Yageo, Max Operating Temperature=155°C, Max Power Dissipation=250mW, Min Operating Temperature=-55°C, Package Quantity=1, Resistance=200kR, Resistor Type="Thick Film", Temperature Coefficient=100ppm/°C, Tolerance=5%, Voltage Rating (DC)=400V, Case/Package=1206, Category="Chip SMD Resistors", ComponentLink1Description=https://datasheet.ciiva.com/2520/pyu-r-int-thick-7-2520645.pdf?src-supplier=Digi-Key, ComponentLink1URL=https://datasheet.ciiva.com/2520/pyu-r-int-thick-7-2520645.pdf?src-supplier=Digi-Key, ComponentLink2Description=https://datasheet.ciiva.com/2520/pyu-r-int-thick-7-2520646.pdf?src-supplier=Digi-Key, ComponentLink2URL=https://datasheet.ciiva.com/2520/pyu-r-int-thick-7-2520646.pdf?src-supplier=Digi-Key, ComponentLink3Description=https://datasheet.ciiva.com/16746/pyu-rc1206-51-rohs-l-4-16746043.pdf?src-supplier=Future+Electronics, ComponentLink3URL=https://datasheet.ciiva.com/16746/pyu-rc1206-51-rohs-l-4-16746043.pdf?src-supplier=Future+Electronics, Construction=Rectangular, Depth=1.6mm, Features="Moisture Resistant", Height=0.026inch, Lead Free="Lead Free", Length=0.122inch, Manufacturer Part Number 1=RC1206JR-07200KL, Military Standard=Not, Mount=SMT, Number of Terminations=2, Packaging="Tape and Reel", Power Rating=250mW, Pricing 1="5000=0,00440 (USD)", RoHS 1=Yes, RoHS Compliant=Yes, Series=RC, Size Code=1206, Stock 1=45000, Supplier 1="Arrow Electronics", Supplier Part Number 1=RC1206JR-07200KL, Type=Резистор, Width=0.063inch
R35 R36 R37 R38 R39 R41 R42 R43 R45 R46 R47 R49 R50 R51 R52 R53 R62 R63 R64 R65 R66 R68 R69 R70 R72 R73 R74 R76 R78 R79 R80 R81 R91 R95: "Chip Resistor Surface Mount 0805 2,2 кОм", Case Code (Imperial)=0805, Case Code (Metric)=2012, Manufacturer 1=Yageo, Max Operating Temperature=155°C, Max Power Dissipation=125mW, Min Operating Temperature=-55°C, Resistance=2.2kR, Resistance Tolerance=5%, Resistor Type="Thick Film", Temperature Coefficient=100ppm/°C, Voltage Rating=150V, Case/Package=0805, Category="Chip SMD Resistors", ComponentLink1Description=https://datasheet.ciiva.com/12667/rc0805-12667397.pdf?src-supplier=Mouser, ComponentLink1URL=https://datasheet.ciiva.com/12667/rc0805-12667397.pdf?src-supplier=Mouser, ComponentLink2Description=https://datasheet.ciiva.com/7941/442941-7941935.pdf?src-supplier=Element14, ComponentLink2URL=https://datasheet.ciiva.com/7941/442941-7941935.pdf?src-supplier=Element14, ComponentLink3Description=https://datasheet.ciiva.com/15190/getdatasheetpartid-251869-15190044.pdf?src-supplier=Verical, ComponentLink3URL=https://datasheet.ciiva.com/15190/getdatasheetpartid-251869-15190044.pdf?src-supplier=Verical, Construction=Rectangular, Contact Plating=Tin,Lead,Matte, Depth=1.25mm, Features="Moisture Resistant", Lead Free="Lead Free", Length=2mm, Manufacturer Part Number 1=RC0805JR-072K2L, Military Standard=Not, Mount=SMT, Number of Terminations=2, Packaging="Tape and Reel", Power Rating=125mW, Pricing 1="5000=0,00590, 10000=0,00350 (USD)", Radiation Hardening=No, REACH SVHC=Unknown, RoHS=Yes, RoHS Compliant=Yes, Series=RC, Size Code=0805, Stock 1=135000, Supplier 1="Arrow Electronics", Supplier Part Number 1=RC0805JR-072K2L, Termination=SMD/SMT, Tolerance=5%, Type=Резистор
R85 R89 R92 R93 R94 R96 R148: "Chip Resistor Surface Mount 0805 100 Ом", Case Code (Imperial)=0805, Case Code (Metric)=2012, Manufacturer 1=Yageo, Max Operating Temperature=155°C, Max Power Dissipation=125mW, Min Operating Temperature=-55°C, Resistance=100R, Resistance Tolerance=5%, Resistor Type="Thick Film", Temperature Coefficient=100ppm/°C, Voltage Rating=150V, Case/Package=0805, Category="Chip SMD Resistors", Contact Plating=Tin,Matte,Lead, Features="Moisture Resistant", Lead Free="Lead Free", Manufacturer Part Number 1=RC0805JR-07100RL, Mount=SMT, Number of Terminations=2, Packaging="Tape and Reel", Power Rating=125mW, Pricing 1="5000=0,00202, 10000=0,00199, 20000=0,00193 (USD)", Radiation Hardening=No, REACH SVHC=Unknown, RoHS=Yes, RoHS Compliant=Yes, Series=RC, Size Code=0805, Stock 1=585000, Supplier 1=Avnet, Supplier Part Number 1=RC0805JR-07100RL, Termination=SMD/SMT, Tolerance=5%, Type=Резистор
U1: "Cyclone IV Family FPGA, 2V Core, 79 I/O Pins, 4 PLLs, 144-Pin QFP, Speed Grade 6, Commercial Grade", Supplier Part Number 1=EP4CE22E22C6-ND, Code_JEDEC=MS-026-BFB, ComponentLink1Description="Manufacturer Link", ComponentLink1URL=http://www.altera.com/, ComponentLink2Description=Handbook, ComponentLink2URL=http://www.altera.com/literature/hb/cyclone-iv/cyclone4-handbook.pdf, ComponentLink3Description="Pinout Specification", ComponentLink3URL=http://www.altera.com/literature/lit-dp.jsp?category=cyc%204&showspreadsheet=y, ComponentLink4Description="Packaging Specification", ComponentLink4URL=http://www.altera.com/literature/ds/dspkg.pdf, DatasheetVersion="ver1.2, Mar-2010", PackageDescription="144-Pin Plastic Enhanced Quad Flat Pack (EQFP144) - Wire Bond", PackageReference=EQFP144, PackageVersion="ver16.0, Dec-2009", Published=3-May-2010, Publisher="Altium Limited", Supplier 1=Digi-Key
U2: "STM32 ARM-based 32-bit MCU with 128 Kbytes Flash, 48-pin LQFP, Industrial Temperature", ComponentLink1Description="Manufacturer Link", ComponentLink1URL=www.st.com/stm32, ComponentLink2Description=Datasheet, ComponentLink2URL=http://www.st.com/stonline/products/literature/ds/13587.pdf, DatasheetVersion="rev6, Mar-2008", PackageDescription="48-Pin Low-Profile Quad Flat Pack, 7 x 7 mm Body, 0.5 mm Pitch (LQFP48)", PackageReference=LQFP48, PackageVersion=Mar-2008, Published=30-May-2008, Publisher="Altium Limited"
U3: library part W25Qxx
X1 X2 X3 X4 X5 X6 X8 X9 X10 X11 X12 X13 X14 X15 X20 X21: "Контрольная площадка", Case/Package=SMD-1, Mount=SMT, Type="Точка контрольная"
  X1 X9 X10: Marck-2=5V0
  X2: Marck-2=1V2
  X3 X6 X8: Marck-2=3V3
  X4: Marck-2=DGND
  X5: Marck-2=AGND
  X11: Marck-2=6V0
  X12: Marck-2=-6V0
  X13: Marck-2=9V0
  X14: Marck-2=-9V0
  X15: Marck-2=2V5
  X20 X21: Marck-2="\"*\""
X7 X17: library part HC-49, "Описание свойств компонента"
X16 X19: library part ST-008G-04, "Описание свойств компонента"

## Via types
v1: diameter 0.66, hole 0.33, Top Layer to Bottom Layer, tented top, 16 vias

## Nets (pads, with @x,y where several pads share a name; then routed paths per layer and width w, separated by ;. In a path a pad name is that pad's centre, name@x,y a point inside that pad or via, vN(x,y) a via of type N, cw(c..) or ccw(c..) an arc to the next point about the centre after c; other vN are vias at no path point)
AOUT_LN: D25.35 R50.1
AOUT_LP: D25.36 R35.1
AOUT_RN: D25.26 R78.1
AOUT_RP: D25.25 R62.1
AVDD_3V3: C109.1 C112.1 C143.2 D21.5 D25.44 X8.1
AVDD_5V0_L: C56.1 C62.1 C146.1 C147.1 D13.5 D25.33 D25.34 R77.2 X9.1
AVDD_5V0_R: C80.1 C83.1 C148.1 C149.2 D15.5 D25.27 D25.28 R97.1 X10.1
AVDD_6V0_N: C113.1 C114.1 C116.2 D22.1 R34.1 R56.1 R58.2 R60.1 R84.1 R114.2 X12.1
AVDD_6V0_P: C98.1 C99.1 C104.1 D20.1 R33.1 R54.2 R55.1 R59.1 R82.1 R111.2 X11.1
AVDD_9V0_N: C65.2 C66.2 C67.2 C119.2 C121.1 C164.2 C165.1 D22.5 D22.8 D27.5 D27.8 L16.2 X14.1
AVDD_9V0_P: C48.1 C49.1 C51.1 C105.1 C106.1 C158.1 C159.1 D20.5 D20.8 D26.5 D26.8 L13.2 X13.1
AVDD_HA_8V0_N: C161.1 C162.1 C163.2 D27.1 R101.2 R110.2 X21.1
AVDD_HA_8V0_P: C155.1 C156.1 C157.1 D26.1 R98.2 R106.2 X20.1
CONN_SE_L: C71.2 R1.1 R39.2 R44.2 R92.1
CONN_SE_R: C126.2 R1.6 R66.2 R71.2 R96.1
CONN_XLR_LN: C79.1 C91.2 R45.1 R48.1 R52.2 R89.1
CONN_XLR_LP: C68.2 C79.2 R37.2 R40.2 R41.1 R85.1
CONN_XLR_RN: C128.2 C131.2 R72.1 R75.1 R80.2 R94.1
CONN_XLR_RP: C123.2 C128.1 R64.2 R67.2 R68.1 R93.1
CPU_DAC_RESET: D12.3 U2.40
CPU_DSD: D4.15 U1.72 U2.22
CPU_F0: D4.12 U1.68 U2.45
CPU_F1: D4.13 U1.69 U2.46
CPU_F2: D4.14 U1.71 U2.21
CPU_I2C_DATA: D10.2 R3.1 U1.77 U2.29
CPU_I2C_SCK: D10.3 R2.1 U1.80 U2.30
CPU_I2S_DATA: R14.1 U1.65
CPU_I2S_LRCK: R13.1 U1.66
CPU_I2S_MCLK: D8.3 R16.1
CPU_I2S_SCK: R15.1 U1.64
CPU_I2S_WCK: U1.67
CPU_SCALE: D4.35 D12.2 U2.2
DAC_DVDD_3V3: C93.1 C97.1 C144.2 D2.5 D10.8 D12.8 D18.5 D25.12 D25.16 D25.48 D30.8 L2.2 L3.2 L4.2 L6.2 R6.1 R21.1 R91.1 X6.1
DAC_DVDD_9V0: C76.1 C77.1 C84.1 L15.1 L17.2 L18.1 L20.1 L21.1
DAC_GEN_44k: D6.1 R9.2
DAC_GEN_48k: D6.2 R12.2
DAC_I2C_DATA: D10.7 D25.9 R21.2
DAC_I2C_SCK: D10.6 D25.8 R6.2
DAC_I2S_DATA: D25.4 R26.1
DAC_I2S_LRCK: D25.5 R25.1
DAC_I2S_MCLK: R17.2 R24.1 R83.1
DAC_I2S_SCK: D25.3 R27.1
DAC_I2S_WCK: D25.6 D30.7
DAC_RESET: D12.6 D25.2
DAC_SCALE: D2.2 D3.1 D12.7
DAC_SCALE_INV: D2.4 D5.1
DAC_SPI_CSN: D25.7 D30.6
DGND: C1.2 C3.2 C4.2 C8.1 C12.2 C13.1 C16.2 C17.2 C18.2 C19.2 C20.2 C21.2 C22.2 C23.2 C24.2 C25.2 C26.2 C27.2 C28.1 C30.1 C31.2 C32.1 C34.2 C35.1 C36.2 C37.1 C38.2 C39.1 C41.2 C42.1 C43.2 C44.1 C57.2 C59.2 C60.2 C86.2 C87.2 C88.2 C189.2 C190.2 C191.1 C193.1 C194.2 C195.1 C196.2 C197.2 C198.2 C199.2 C200.2 C201.1 C202.2 C203.2 C204.2 C205.2 C206.2 C207.2 C208.2 C209.2 C210.2 C211.2 C212.2 C213.2 C214.2 C215.2 C216.2 C217.2 C218.2 C219.2 C220.2 C221.2 C222.2 C223.2 C224.2 C225.2 C226.2 C227.2 C228.2 C229.2 C230.2 C231.2 C232.2 C233.2 C234.2 C235.2 D1.2 D4.0 D4.3 D4.6 D4.11 D4.17 D4.24 D4.25 D4.32 D4.33 D4.45 D7.4 D8.2 D8.8 D9.2 D10.4 D11.2 D12.4 D14.2 D17.2 D30.4 D31.2 D32.2 D33.4 J.4 P1.3 P1.4 P2.2 P2.10 P3.3 R4.2 R10.1 R19.2 R28.2 R29.1 R31.2 R88.1 R125.1 R127.1 R129.1 R132.2 R134.2 R136.2 R140.1 R146.2 U1.2 U1.4 U1.19 U1.22 U1.27 U1.36 U1.41 U1.48 U1.57 U1.63 U1.74 U1.79 U1.82 U1.95 U1.108 U1.118 U1.123 U1.131 U1.140 U2.8 U2.23 U2.35 U2.47 U3.4 X4.1
DVDD_1V2: C24.1 C25.1 C26.1 C27.1 C34.1 C35.2 C214.1 C215.1 C216.1 C217.1 C218.1 C219.1 C220.1 C221.1 C222.1 C223.1 C224.1 C225.1 C226.1 C227.1 D4.7 D4.18 D4.34 D4.44 L7.1 U1.1 U1.5 U1.29 U1.34 U1.37 U1.38 U1.45 U1.61 U1.70 U1.73 U1.78 U1.84 U1.102 U1.109 U1.116 U1.124 U1.134 U1.138 X2.1
DVDD_2V5: C189.1 C193.2 C228.1 C229.1 C230.1 C231.1 L22.1 U1.3 U1.35 U1.75 U1.107 X15.1
DVDD_3V3: C16.1 C17.1 C18.1 C19.1 C20.1 C21.1 C22.1 C23.1 C41.1 C42.2 C199.1 C202.1 C203.1 C204.1 C205.1 C206.1 C207.1 C208.1 C209.1 C210.1 C211.1 C212.1 C213.1 C232.1 C233.1 C234.1 C235.1 D4.2 D4.10 D4.23 D4.26 D4.31 D4.42 D4.46 D7.8 D9.1 D10.1 D12.1 D30.1 D33.8 L5.1 L10.1 L25.2 P2.4 R2.2 R3.2 R18.1 R126.2 R128.2 R130.2 R131.1 R133.1 R135.1 R137.2 R138.2 R139.2 R142.1 U1.17 U1.26 U1.40 U1.47 U1.56 U1.62 U1.81 U1.93 U1.117 U1.122 U1.130 U1.139 U2.1 U2.9 U2.24 U2.36 U2.48 U3.8 X3.1
FLASH_CLK: D4.37 D7.6
FLASH_CS: D4.41 D7.1
FLASH_DI: D4.38 D7.5
FLASH_DO: D4.40 D7.2
FLASH_SPI_MISO: U2.27 U3.2
FLASH_SPI_MOSI: U2.28 U3.5
FLASH_SPI_NSS: U2.25 U3.1
FLASH_SPI_SCK: U2.26 U3.6
FLASH_WP: D4.39 D7.3 R19.1
FPGA_27M: R100.2 U1.23
FPGA_CONF_DONE: U1.92 U2.41
FPGA_FLASH_CLK: R87.2 R144.1 U1.12
FPGA_FLASH_CS: R145.1 U1.8
FPGA_FLASH_DI: R141.1 U1.6
FPGA_FLASH_DO: R22.1 R143.1 U1.13
FPGA_FLASH_WP: D33.3 R146.1
FPGA_I2S_DATA: D8.4 U1.58
FPGA_I2S_LRCK: D8.5 U1.59
FPGA_I2S_MCLK: D8.6 U1.24
FPGA_I2S_WCK: D30.2 U1.60
FPGA_MSEL0: R135.2 R136.1 U1.94 U2.18
FPGA_MSEL1: R133.2 R134.1 U1.96 U2.19
FPGA_MSEL2: R131.2 R132.1 U1.97 U2.20
FPGA_nCE: U1.21 U2.39